# Altium PCB Opam.PcbDoc
Units mm, origin at the board's own origin, x right, y up, seen from the top; angles counter-clockwise.
Board outline 117.02 x 57.35 mm, 2 copper layers (Top Layer, Bottom Layer); 14 components, 8 nets, 44 pads, 0 vias.
Unrouted connection lines stored in the file: 5.
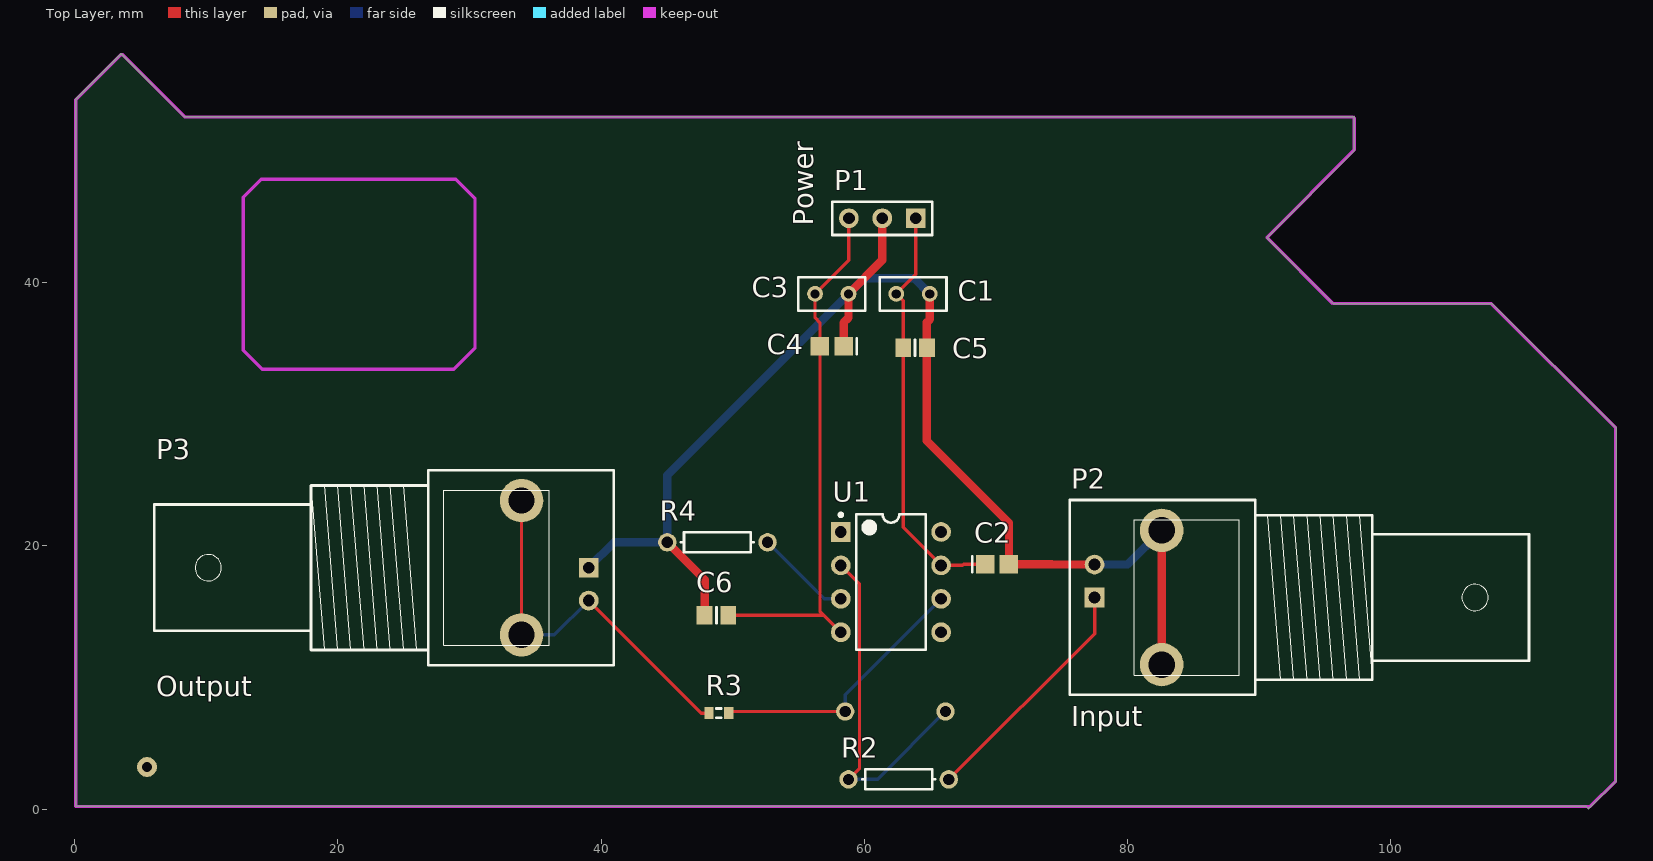
[diagram p0: Top Layer view]
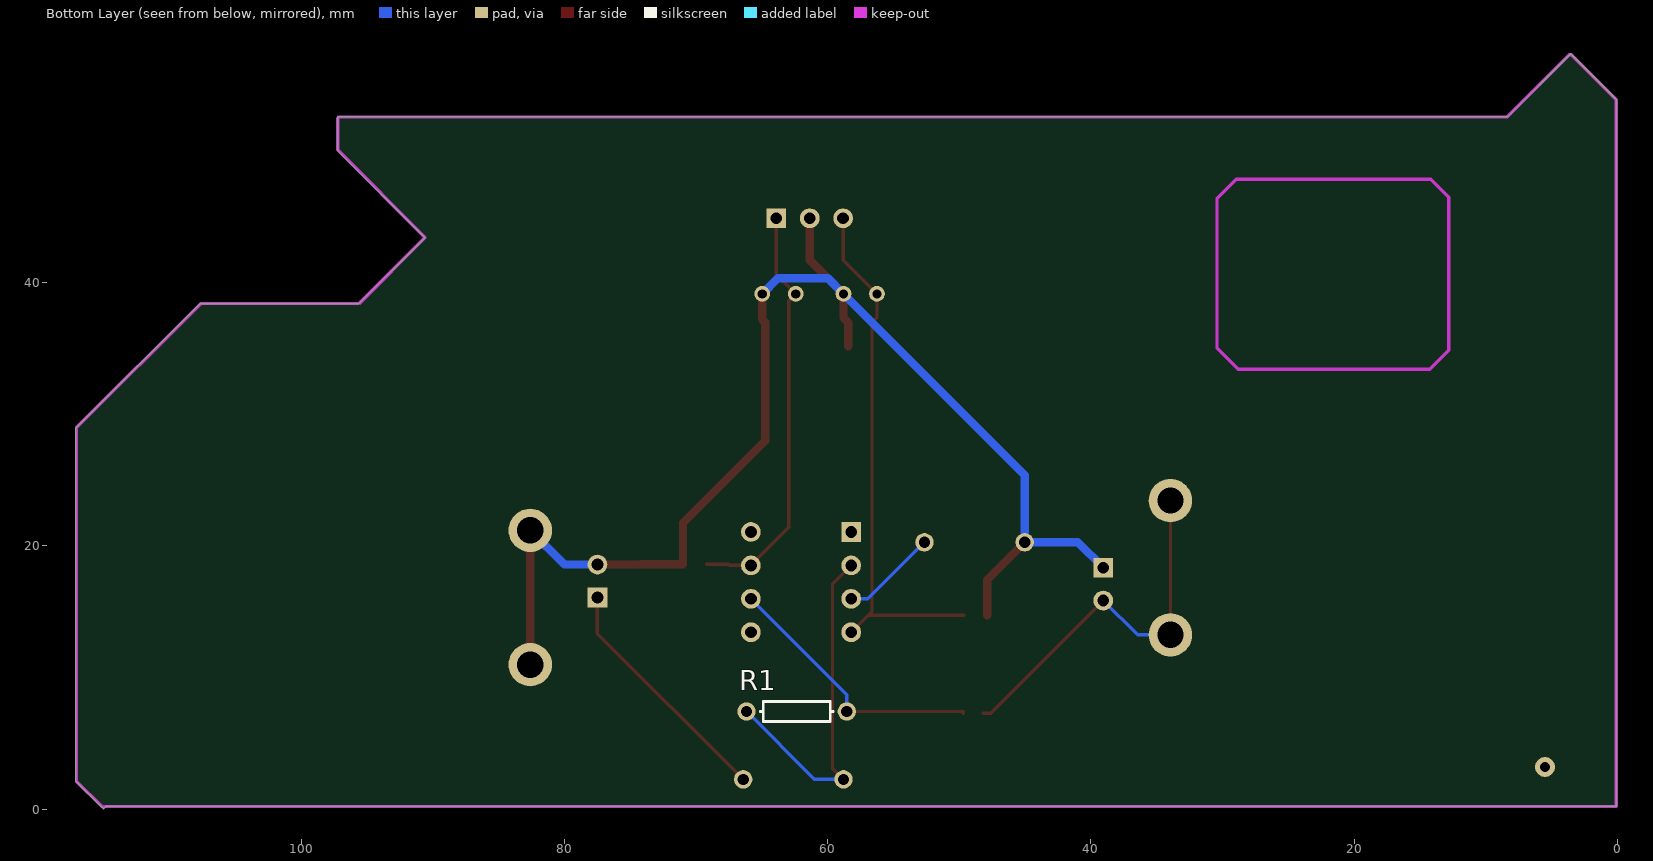
[diagram p1: Bottom Layer view, seen from below]

## Layer stack, top to bottom
Top Solder: solder mask 0.0102, Solder Resist, Dk 3.5
Top Layer: signal copper 0.0356
Dielectric 1: dielectric 0.32, FR-4, Dk 4.8
Bottom Layer: signal copper 0.0356
Bottom Solder: solder mask 0.0102, Solder Resist, Dk 3.5

## Board outline
0.102,0.203 0.102,53.924 3.556,57.379 8.357,52.578 97.231,52.578 97.231,50.038 90.602,43.409 95.606,38.405 107.671,38.405 117.119,28.956 117.119,2.134 115.011,0.025 114.833,0.203

## Design rules (kind name [scope] priority, off if disabled: settings)
Clearance [All] p1: gap=0.254 ignorepadtopadclearanceinfootprint=FALSE except(0: Arc-Hole Track-Hole SMDPad-Hole THPad-Hole Via-Hole Fill-Hole Poly-Hole Region-Hole Text-Hole)
PolygonConnect [All] p1: connectstyle=Relief reliefconductorwidth=0.254 reliefentries=4 polygonreliefangle="90 Angle" airgapwidth=0.254
RoutingVias [All] p1: holewidth=0.711 width=1.27 viastyle="Through Hole" minholewidth=0.711 minwidth=1.27 maxholewidth=0.711 maxwidth=1.27
SolderMaskExpansion [All] p1: expansion=0.102
Width "Schematic Width Constraint" [InNet('GND')] p1: maxlimit=0.762 minlimit=0.508 preferedwidth=0.635
Width [All] p2: maxlimit=0.254 minlimit=0.254 preferedwidth=0.254
30 further rules are at their usual default settings.

## Components (designator, comment, footprint, x,y, rotation, side; value= is the part's Value field where it differs from the comment)
C1 "Cap" RAD-0.1 63.703,39.141 r180 top value=100nF
C2 "Cap Pol1" C2512 70.09,18.593 r0 top value=100uF
C3 "Cap" RAD-0.1 57.531,39.141 r180 top value=100nF
C4 "Cap Pol1" C2512 57.531,35.154 r180 top value=100uF
C5 "Cap" 6-0805_N 63.856,35.052 r0 top value=100nF
C6 "Cap" 6-0805_N 48.768,14.732 r0 top value=100nF
P1 "Power" HDR1X3 63.906,44.882 r180 top
P2 "Input" "BNC_RA CON" 77.495,16.078 r180 top
P3 "Output" "BNC_RA CON" 39.065,18.339 r0 top
R1 "Res1" AXIAL-0.3 62.357,7.417 r180 bottom value=50K
R2 "Res1" AXIAL-0.3 62.611,2.261 r180 top value=10K
R3 "Res3" J1-0603 48.946,7.29 r180 top value=50
R4 "Res1" AXIAL-0.3 48.844,20.269 r0 top value=10K
U1 "Op Amp" DIP-8 62.027,17.247 r0 top

## Footprints (in the part's own frame and the unit in brackets; to place one, negate y for a bottom-side part, rotate by r counter-clockwise, add the part's x,y. Pads: shape width x height; smd on the part's side, far side on the other; paste and mask are expansions set on the pad)
6-0805_N [mm] "Chip Resistor, Body 2.0x1.2mm, IPC Medium Density"
  rect 1.2x1.4 smd: 1(-0.9,0) 2(0.9,0)
  silkscreen extent 0,-0.6 0,0.6, body extent -1.07,-0.7 1.07,0.7, height 0.7
AXIAL-0.3 [mm] "Axial Device, Thru-Hole; 2 Leads; 0.3 in Pin Spacing"
  round 1.4 hole 0.85: 1(-3.81,0) 2(3.81,0)
  silkscreen extent -2.77,-0.76 2.77,0.76
"BNC_RA CON" [mm] "Connector; BNC Elbow"
  rect 1.5x1.5 hole 0.9: 1(0,0)
  round 3.3 hole 2: 2(-5.1,5.1) 2(-5.1,-5.1)
  round 1.5 hole 0.9: 2(0,-2.5)
  silkscreen extent -33,-7.4 1.9,7.4
C2512 [mm] "Chip Capacitor, Body 2.54x1.27mm, IPC High Density"
  rect 1.4x1.4 smd: 1(-0.9,0) 2(0.9,0)
  silkscreen extent -1.9,-0.6 -1.9,0.6, body extent -1.45,-0.82 1.45,0.82, height 1.3
DIP-8 [mm] "DIP; 8 Leads; Row Spacing 7.62 mm; Pitch 2.54 mm"
  rect 1.5x1.5 hole 0.9: 1(-3.81,3.81)
  round 1.5 hole 0.9: 2(-3.81,1.27) 3(-3.81,-1.27) 4(-3.81,-3.81) 5(3.81,-3.81) 6(3.81,-1.27) 7(3.81,1.27) 8(3.81,3.81)
  silkscreen extent -3.93,-5.15 2.65,5.23, body extent -3.6,-5.15 3.6,5.15, height 5.08
HDR1X3 [mm] "Connector; Header; 3 Position"
  rect 1.5x1.5 hole 0.9: 1(0,0)
  round 1.5 hole 0.9: 2(2.54,0) 3(5.08,0)
  silkscreen extent -1.27,-1.27 6.35,1.27
J1-0603 [mm] "Chip Resistor, Body 1.6x0.8mm, IPC High Density"
  rect 0.7x0.9 smd: 1(-0.75,0) 2(0.75,0)
  silkscreen extent -0.2,-0.35 0.2,0.35, body extent -0.85,-0.48 0.85,0.48, height 0.9
RAD-0.1 [mm] "Radial Cap, Thru-Hole; 2 Leads; 0.1 in Pin Spacing"
  round 1.2 hole 0.7: 1(-1.27,0) 2(1.27,0)
  silkscreen extent -2.54,-1.27 2.54,1.27

## Part data
C1 C3 C5 C6: "Capacitor", LatestRevisionDate=17-Jul-2002, LatestRevisionNote="Re-released for DXP Platform.", PackageDescription="Radial Cap, Thru-Hole; 2 Leads; 0.3 in Pin Spacing", PackageReference=RAD-0.3, Published=8-Jun-2000, Publisher="Altium Limited"
C2 C4: "Polarized Capacitor (Radial)", LatestRevisionDate=17-Jul-2002, LatestRevisionNote="Re-released for DXP Platform.", PackageDescription="Polarized Capacitor (Radial); 2 Leads", PackageReference=RB7.6-15, Published=8-Jun-2000, Publisher="Altium Limited"
P1: library part "Header 3", "Header, 3-Pin", LatestRevisionDate=17-Jul-2002, LatestRevisionNote="Re-released for DXP Platform.", Publisher="Altium Limited"
P2 P3: library part BNC, "BNC Elbow Connector", LatestRevisionDate=17-Jul-2002, LatestRevisionNote="Re-released for DXP Platform.", Publisher="Altium Limited"
R1 R2 R3 R4: "Resistor", Published=8-Jun-2000, Publisher="Altium Limited"
  R1 R2 R4: LatestRevisionDate=17-Jul-2002, LatestRevisionNote="Re-released for DXP Platform.", PackageDescription="Axial Device, Thru-Hole; 2 Leads; 0.3 in Pin Spacing", PackageReference=AXIAL-0.3
  R3: LatestRevisionDate=29-May-2009, LatestRevisionNote="IPC-7351 Footprint Added.", PackageDescription="Chip Resistor", PackageReference=J1-0603
U1: "FET Operational Amplifier", ComponentLink1Description="Manufacturer Link", ComponentLink1URL=http://www.analog.com/, DatasheetVersion="REV. B", LatestRevisionDate=17-Jul-2002, LatestRevisionNote="Re-released for DXP Platform.", PackageDescription="Can; 8 Leads; Pin Circle Dia. 5.08 mm; Lead Dia. 0.53 mm (max)", PackageReference=H-08A, PackageVersion=1990, Published=8-Jun-2000, Publisher="Altium Limited"

## Free pads (board coordinates)
  round 1.524 hole 0.762: 2(5.512,3.2) 3(2514.575,1816.252) 4(2446.147,1883.664) 5(2425.395,2080.946) 6(2412.873,2207.057)

## Nets (pads, with @x,y where several pads share a name; then routed paths per layer and width w, separated by ;. In a path a pad name is that pad's centre, name@x,y a point inside that pad or via, vN(x,y) a via of type N, cw(c..) or ccw(c..) an arc to the next point about the centre after c; other vN are vias at no path point)
+12VDC: C1.2 C2.1 C5.1 P1.1 U1.7 | length 31.8
  Top Layer w0.254: P1.1 63.906,40.615 C1.2 62.956,38.619 C5.1 62.956,21.398 U1.7 67.462,18.517 67.539,18.593 C2.1
-12VDC: C3.2 C4.2 C6.2 P1.3 U1.4 | length 40.6
  Top Layer w0.254: C6.2 56.921,14.732 ; U1.4 56.921,14.732 ; P1.3 58.826,41.707 C3.2 56.261,37.327 56.631,36.957 C4.2 56.631,15.022 56.921,14.732
GND: C1.1 C2.2 C3.1 C4.1 C5.2 C6.1 P1.2 P2.2 P3.1 pad.2 pad.3 pad.4 pad.5 pad.6 R4.1 | length 102.3
  Top Layer w0.635: R4.1 47.868,17.435 C6.1 ; C4.1 58.431,36.957 58.801,37.327 C3.1 61.366,41.707 P1.2 ; C1.1 64.973,37.2 64.756,36.982 C5.2 64.756,27.98 70.99,21.746 C2.2 74.219,18.593 74.233,18.578 P2.2@77.495,18.578 ; P2.2@82.595,10.978 P2.2@82.595,21.178
  Bottom Layer w0.635: P3.1 40.996,20.269 R4.1 45.034,25.375 C3.1 59.995,40.335 63.779,40.335 C1.1 ; P2.2@77.495,18.578 79.995,18.578 P2.2@82.595,21.178
Input: P2.1 R2.1 | length 18.4
  Top Layer w0.254: R2.1 77.495,13.335 P2.1
NetP3_2: P3.2 R3.2 | length 29
  Top Layer w0.254: P3.2@33.965,13.239 P3.2@33.965,23.439 ; P3.2@39.065,15.839 47.614,7.29 R3.2
  Bottom Layer w0.254: P3.2@33.965,13.239 36.465,13.239 P3.2@39.065,15.839
NetR1_1: R1.1 R2.2 U1.2 | length 26.7
  Top Layer w0.254: U1.2 59.639,17.094 59.639,3.099 R2.2
  Bottom Layer w0.254: R2.2 61.011,2.261 R1.1
NetR1_2: R1.2 R3.1 U1.6 | length 20.6
  Top Layer w0.254: R3.1 49.696,7.417 R1.2
  Bottom Layer w0.254: R1.2 58.547,8.687 U1.6
NetR4_2: R4.2 U1.3 | length 7.3
  Bottom Layer w0.254: R4.2 56.947,15.977 U1.3
pads on no net: U1.1 U1.5 U1.8

## Keep-outs
Keep-Out Layer:
  lines w0.254: 0.102,0.203 115.164,0.203 117.069,2.108 117.069,28.981 107.645,38.405 95.606,38.405 90.602,43.409 90.602,43.459 97.231,50.089 97.231,52.476 97.13,52.578 8.382,52.578 3.658,57.302 3.505,57.302 0.102,53.899 0.102,0.203 ; 12.827,34.849 14.249,33.426 28.804,33.426 30.429,35.052 30.429,46.38 28.956,47.854 14.199,47.854 12.827,46.482 12.827,34.849